# Altium PCB Basic Datalogger-v1.0.PcbDoc (part 1 of 2)
Units mil, origin at the board's own origin, x right, y up, seen from the top; angles counter-clockwise.
Board outline 1637.8 x 1745.25 mil, 2 copper layers (Top Layer, Bottom Layer), stack 57 mil thick; 64 components, 61 nets, 279 pads, 114 vias.
Unrouted connection lines stored in the file: 1.
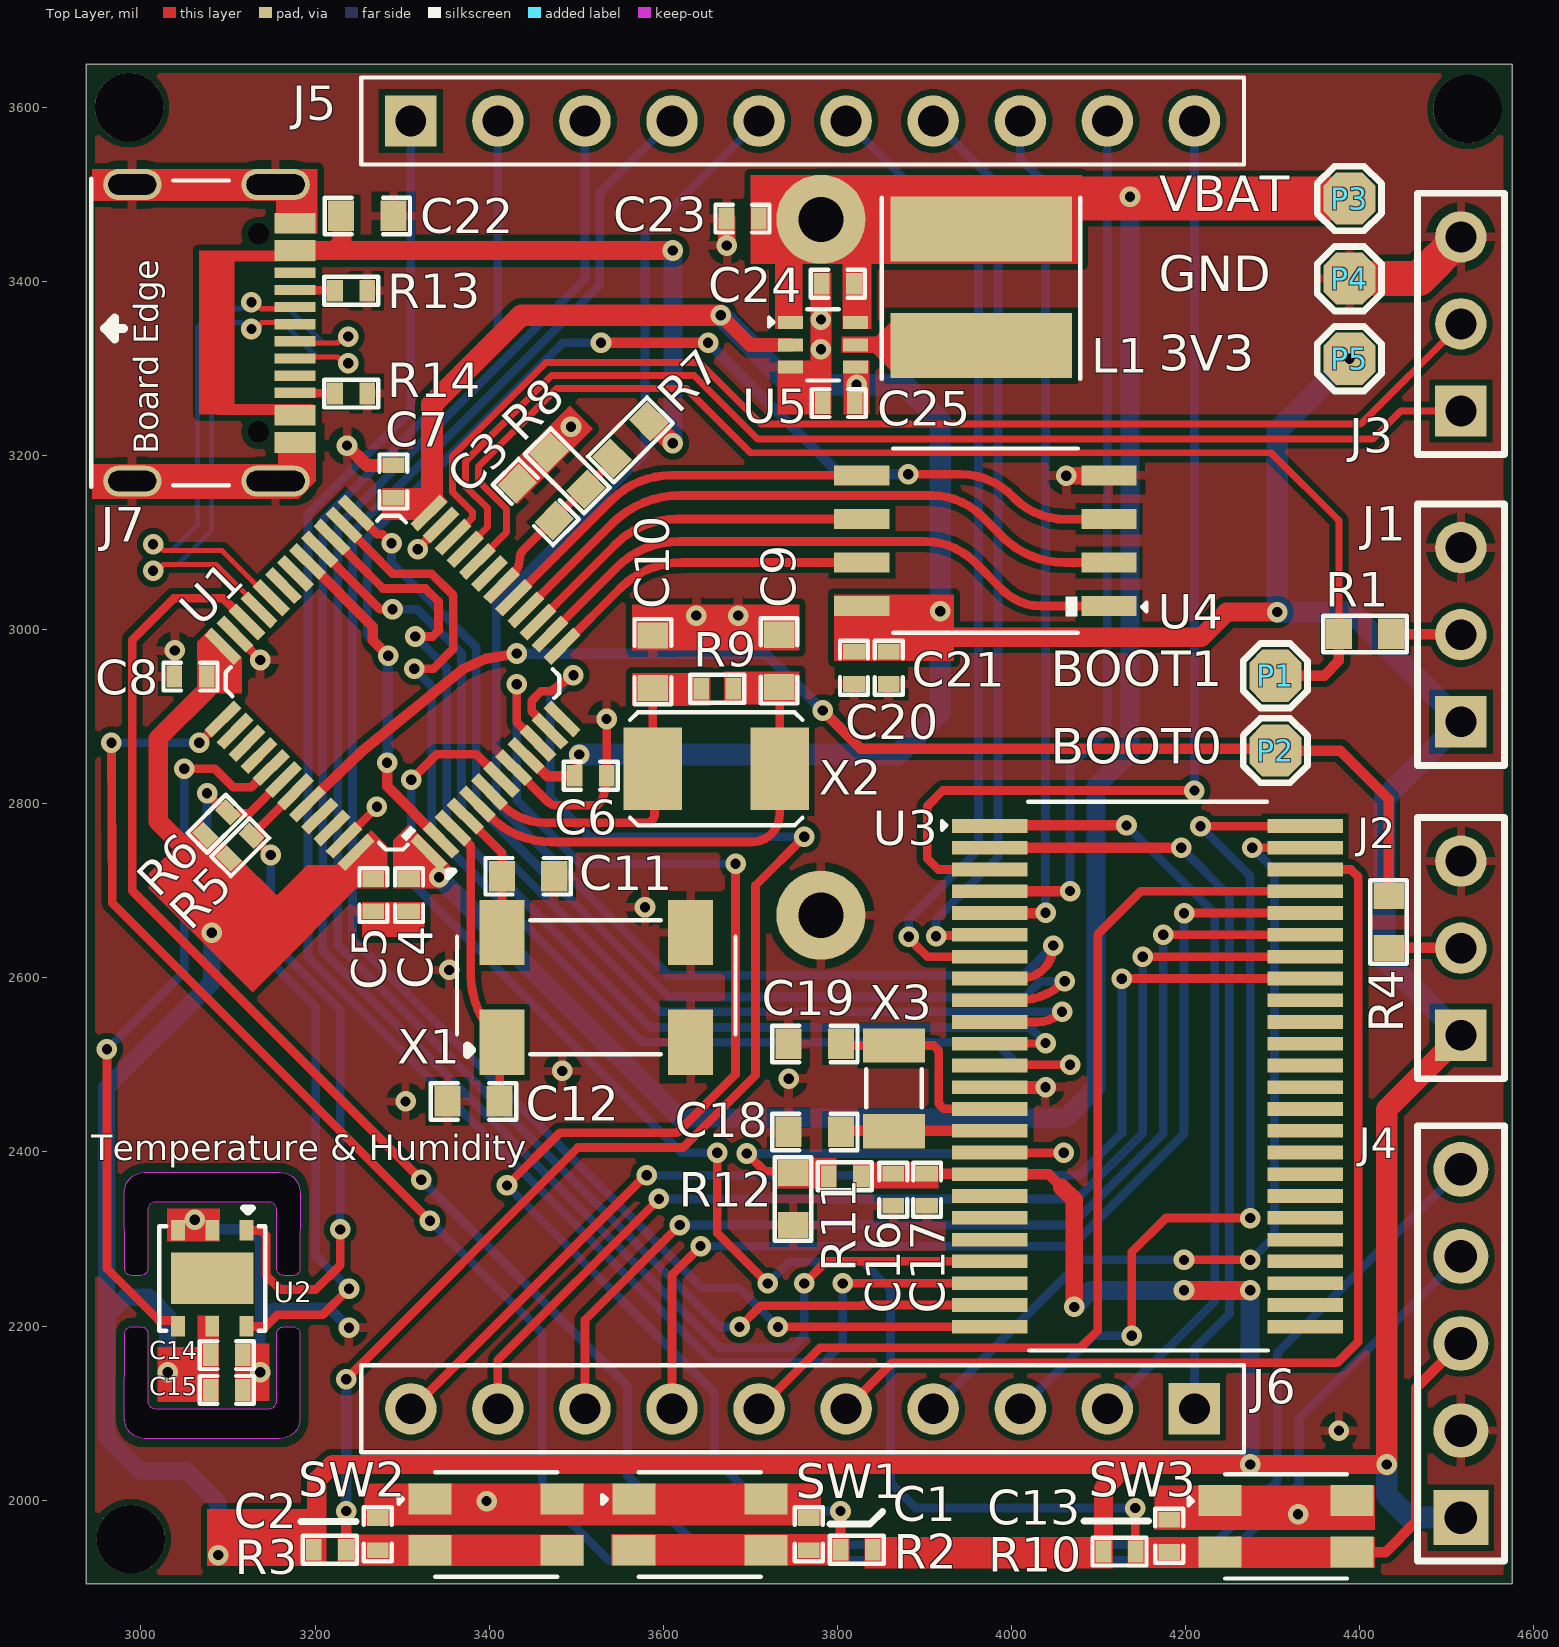
[diagram p0: Top Layer view]
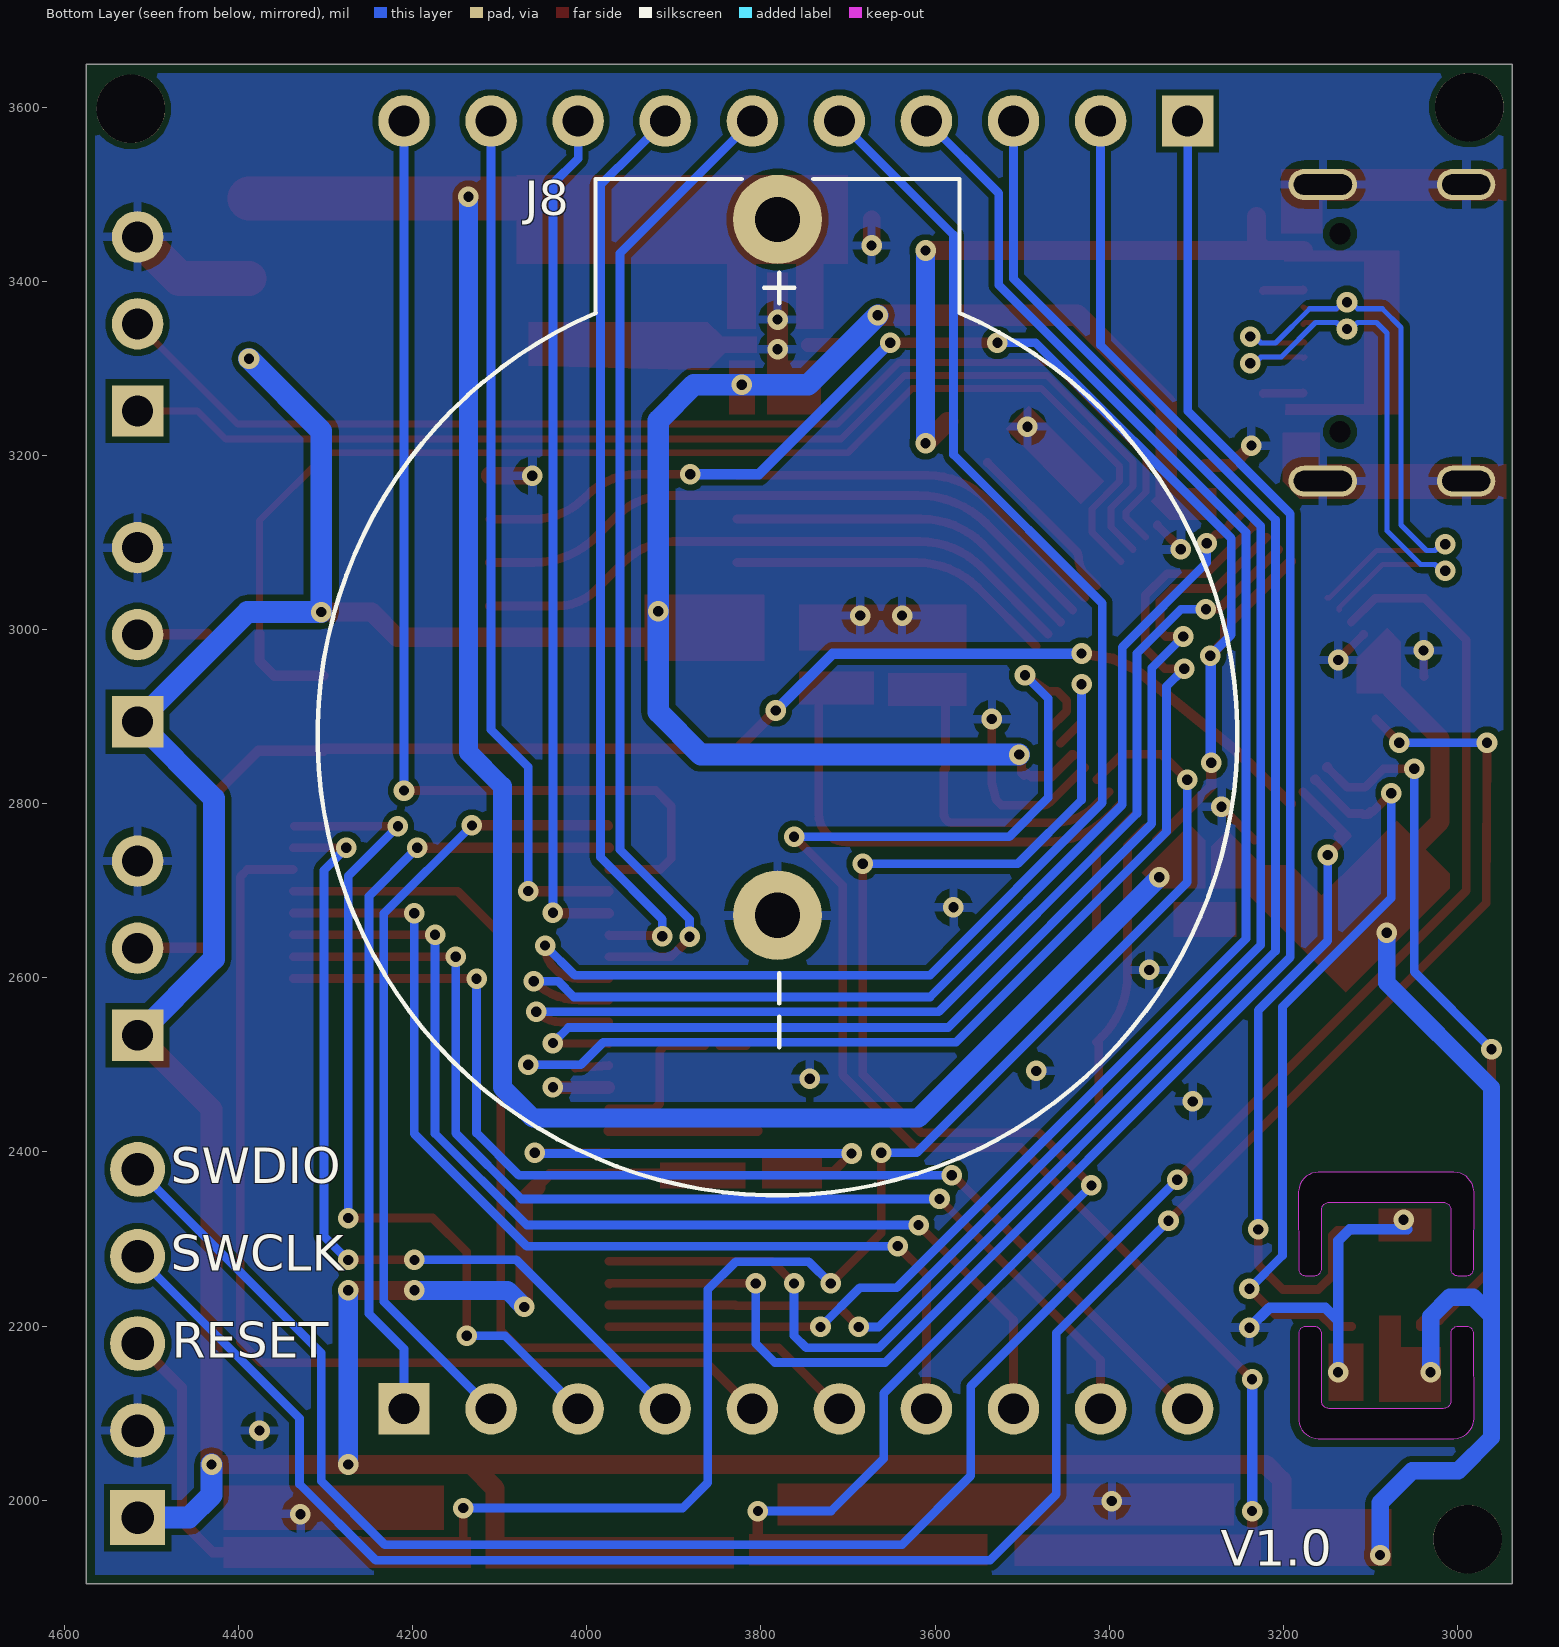
[diagram p1: Bottom Layer view, seen from below]
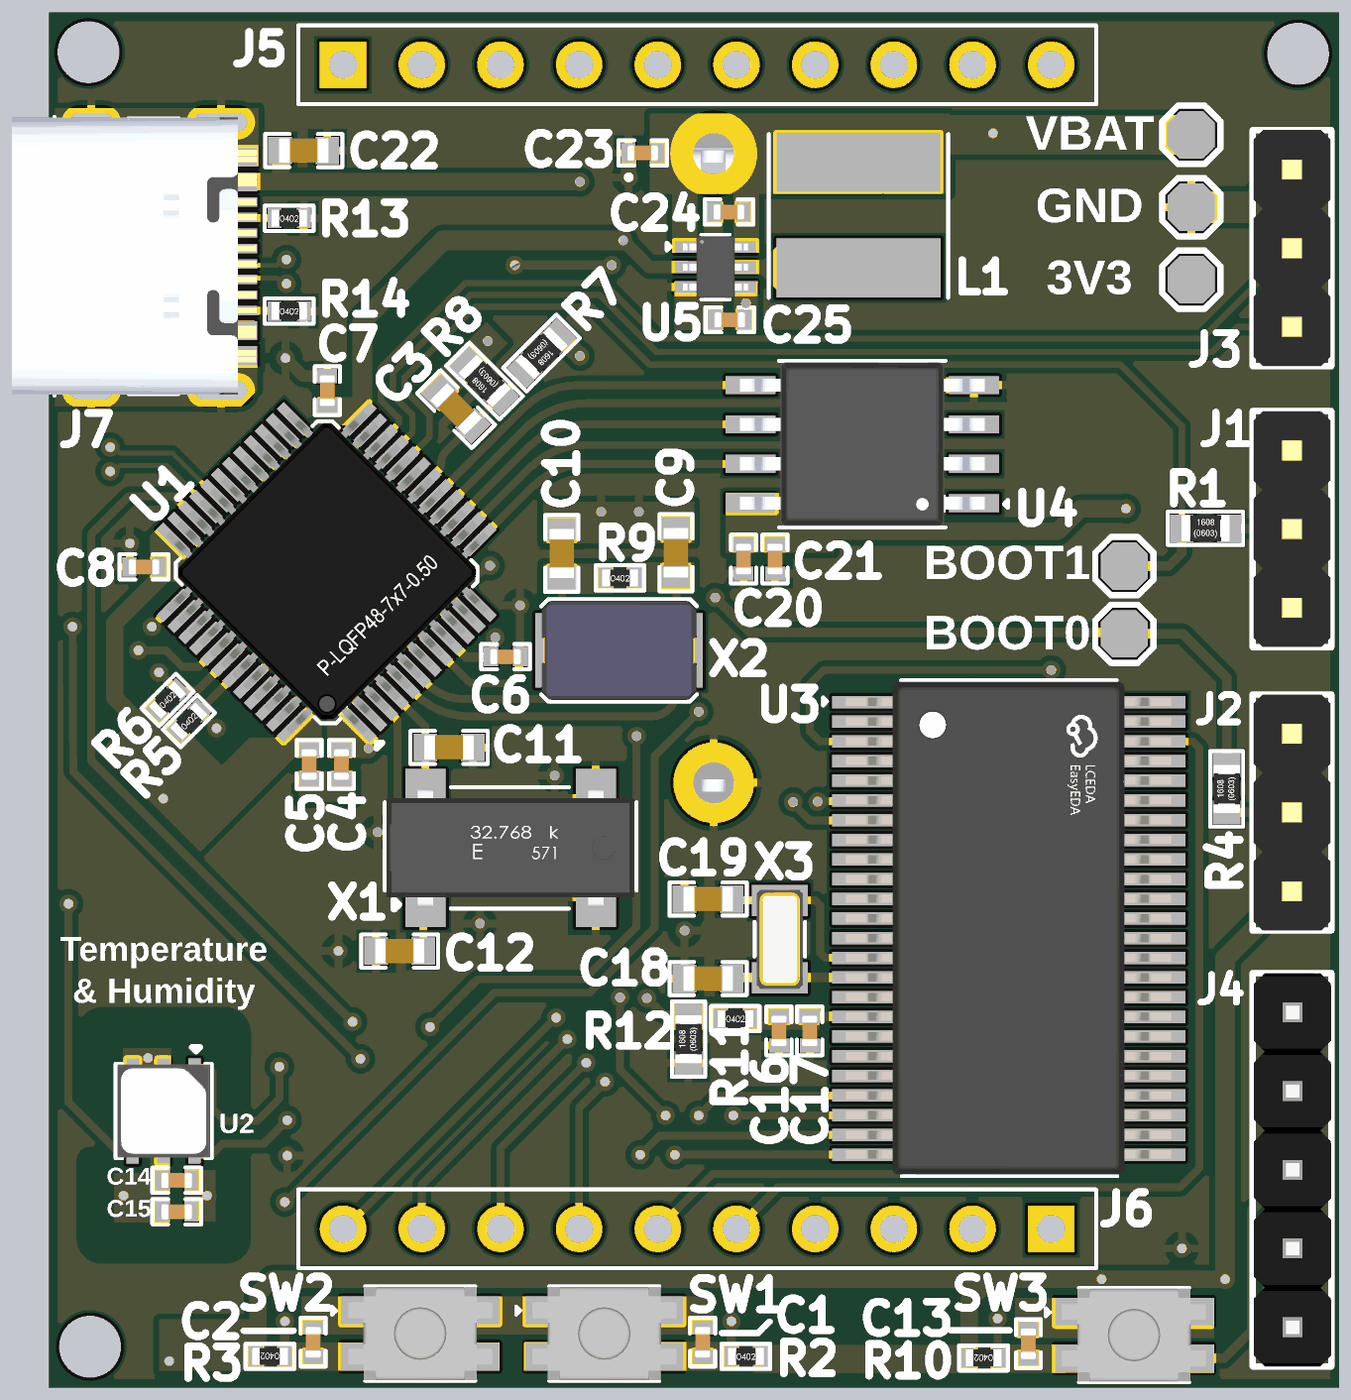
[diagram p2: 3D render of the assembled board from above, using the file's embedded part models]

## Layer stack, top to bottom
Top Solder: solder mask 3, Solder Resist, Dk 3.5
Top Layer: signal copper 10
Dielectric 1: dielectric 37, FR-4, Dk 4.8
Bottom Layer: signal copper 10
Bottom Solder: solder mask 3, Solder Resist, Dk 3.5

## Board outline
2937.2,1904 4575,1904 4575,3649.25 2937.2,3649.25
cut-out: 3182.56,2091.35 cw(c3159.88,2093.63) 3159.88,2070.84 3004.12,2070.84 cw(c3004.12,2093.63) 2981.44,2091.35 2981.02,2092.7 2981.46,2190.58 2981.33,2191.35 cw(c2989.28,2191.35) 2989.28,2199.3 2999.95,2199.31 cw(c2999.95,2191.31) 3007.95,2191.31 3007.95,2113.54 ccw(c3016.25,2113.54) 3016.25,2105.24 3147.75,2105.24 ccw(c3147.75,2113.54) 3156.05,2113.54 3156.05,2191.31 cw(c3164.05,2191.31) 3164.05,2199.31 3174.83,2199.31 cw(c3174.83,2191.62) 3182.5,2192.05 3182.54,2191.63
cut-out: 3182.48,2265.06 cw(c3174.83,2265.75) 3174.83,2258.06 3164.05,2258.06 cw(c3164.05,2266.06) 3156.05,2266.06 3156.05,2333.83 ccw(c3147.75,2333.83) 3147.75,2342.13 3016.25,2342.13 ccw(c3016.25,2333.83) 3007.95,2333.83 3007.95,2266.06 cw(c2999.95,2266.06) 2999.95,2258.06 2989.28,2258.07 cw(c2989.28,2266.02) 2981.33,2266.02 2981.41,2266.65 2981.02,2354.67 2981.44,2356.02 cw(c3004.12,2353.74) 3004.12,2376.53 3159.88,2376.53 cw(c3159.88,2353.74) 3182.56,2356.02 3182.98,2354.67

## Design rules (kind name [scope] priority, off if disabled: settings)
BoardOutlineClearance [All] p1: gap=0 ignorepadtopadclearanceinfootprint=FALSE except(10: Poly-OutlineEdge Poly-CavityEdge Poly-CutoutEdge Poly-SplitBarrior Poly-SplitContinuation)
Clearance [All] p1: gap=7 ignorepadtopadclearanceinfootprint=FALSE except(5: Arc-SMDPad Track-SMDPad SMDPad-SMDPad SMDPad-THPad SMDPad-Hole)
DiffPairsRouting [InDifferentialPair('USB')] p1: maxlimit=10 minlimit=10 mostfreqgap=10 toplayer_minwidth=6 toplayer_maxwidth=6 toplayer_prefwidth=6 bottomlayer_minwidth=6 bottomlayer_maxwidth=6 bottomlayer_prefwidth=6 impedanceprofiledriven=TRUE impedanceprofileid={42EBA23B-1863-4E57-B42D-8314DE1A37D2} impedanceprofilevalue=90.000000 maxuncoupledlength=500
HoleSize [All] p1: absolutevalues=TRUE maxlimit=1000 minlimit=1 maxpercent=80.000 minpercent=20.000
HoleToHoleClearance [All] p1: gap=1 allowstackedmicrovias=TRUE
MatchedLengths "Schematic Matched Net Lengths" [InNetClass('USB')] p1: tolerance=50 checknetsindiffpair=FALSE checkdiffpairvsdiffpair=TRUE checkxsignals=TRUE checkothers=TRUE
MaxMinImpedance "Schematic Impedance Constraint" [InNetClass('USB')] p1: minimum=85.00 maximum=90.00
MinimumSolderMaskSliver [All] p1: minsoldermaskwidth=0
PolygonConnect [All] p1: connectstyle=Relief reliefconductorwidth=10 reliefentries=4 polygonreliefangle="90 Angle" airgapwidth=10
RoutingVias [All] p1: holewidth=11.81 width=23.62 viastyle="Through Hole" minholewidth=11.81 minwidth=23.62 maxholewidth=11.81 maxwidth=23.62
SilkToSilkClearance [All] p1: silktosilkclearance=0
SilkToSolderMaskClearance [IsPad] p1: minsilkscreentomaskgap=0 clearancetoexposedcopper=TRUE
SolderMaskExpansion [All] p1: expansion=4 istentingtop=FALSE
Width [All] p1: maxlimit=100 minlimit=8 preferedwidth=12 minimp=50.000000 maximp=50.000000 favimp=50.000000
24 further rules are at their usual default settings.

## Classes and differential pairs
component class U_Power-Sheet: C22 C23 C24 C25 J7 J8 l L1 R13 R14 U5
differential pair class USB_Lines: USB
net class USB: USB_N USB_P
component class U_TN-Screen-Sheet: C16 C17 C18 C19 J5 J6 R11 R12 U3 X3
component class U_Sensor-Sheet: C14 C15 U2
component class U_EPROM-Sheet: C20 C21 U4
component class U_Controller-Sheet: * C1 C2 C3 C4 C5 C6 C7 C8 C9 C10 C11 C12 C13 J1 J2 J3 J4 P1 P2 P3 P4 P5 R1 R2 R3 R4 R5 R6 R7 R8 R9 R10 SW1 SW2 SW3 U1 X1 X2
differential pair USB: +USB_P -USB_N

## Components (designator, comment, footprint, x,y, rotation, side; value= is the part's Value field where it differs from the comment)
C1 "1uF" Cap-0402 3767,1961 r270 top
C2 "1uF" Cap-0402 3272,1961 r270 top
C3 "0.1uF" Cap-0603 3453.57,3146.43 r315 top locked
C4 "100nF" Cap-0402 3308,2695 r90 top locked
C5 "100nF" Cap-0402 3267,2695 r90 top locked
C6 "100nF" Cap-0402 3516.5,2832 r180 top
C7 "100nF" Cap-0402 3290,3170 r270 top locked
C8 "100nF" Cap-0402 3057,2946 r0 top
C9 "20pF" Cap-0603 3733,2964 r270 top locked
C10 "20pF" Cap-0603 3588,2963 r270 top locked
C11 "20pF" Cap-0603 3444.73,2716.65 r180 top
C12 "20pF" Cap-0603 3382,2458 r0 top
C13 "1uF" Cap-0402 4181,1959 r270 top
C14 "100nF" Cap-0402 3098.6,2166.68 r180 top locked
C15 "1uF" Cap-0402 3098.6,2126.68 r180 top locked
C16 "1uF" Cap-0402 3864,2356.5 r90 top locked
C17 "100nF" Cap-0402 3903,2356.5 r90 top locked
C18 "10pF" Cap-0603 3774,2423 r0 top locked
C19 "10pF" Cap-0603 3774,2524 r0 top locked
C20 "100nF" Cap-0402 3819,2956 r90 top
C21 "1uF" Cap-0402 3859,2956 r90 top
C22 "2.2uF" CAP-0603 3260,3475 r180 top locked
C23 "10uF" Cap-0402 3691,3472 r0 top locked
C24 "10uF" Cap-0402 3800.5,3397 r0 top locked
C25 "10uF" Cap-0402 3801.5,3260 r0 top locked
J1 "61300311121" HDR1X3_ 4516,2894 r90 top locked
J2 "61300311121" HDR1X3_ 4516,2534 r90 top locked
J3 "C49257" HDR1X3_ 4516,3251 r90 top locked
J4 "B-2100S05P-A110" HDR1X5_ 4516,1980 r90 top locked
J5 "DM254R-11-10-85" "HDR 1x10(Female)" 3310,3584 r0 top locked
J6 "DM254R-11-10-85" "HDR 1x10(Female) B" 4210,2105 r180 top locked
J7 "TYPE-C-31-M-12" TYPE-C-31-M-12_ 3177.13,3466.76 r270 top locked
J8 "BS-24-A1AJ008" BS-24-A1AJ008 3781,3071.39 r90 bottom locked
L1 "4.7uH" SCDS4D18T-4R7M-S-N 3965,3392.93 r270 top locked
P1 "TEST POINT" Test-point 4303,2947 r270 top locked
P2 "TEST POINT" Test-point 4303,2861 r270 top locked
P3 "TEST POINT" Test-point 4388,3495 r0 top locked
P4 "TEST POINT" Test-point 4388,3403 r0 top locked
P5 "TEST POINT" Test-point 4388,3311 r0 top locked
R1 "10K" Res-0603 4406,2995 r180 top locked value=10kR
R2 "10K" Res-0402 3822,1943 r0 top
R3 "10K" Res-0402 3217,1943 r180 top
R4 "10K" Res-0603 4433,2664 r270 top locked value=10kR
R5 "4.7K" Res-0402 3114,2750 r45 top locked
R6 "4.7K" Res-0402 3086.92,2776.92 r45 top locked
R7 "5.6K" Res-0603 3562.21,3217.79 r45 top locked
R8 "10K" Res-0603 3489.79,3182.21 r315 top locked value=10kR
R9 "1MR" Res-0402 3662,2932 r0 top locked
R10 "10K" Res-0402 4124,1941 r180 top
R11 "1K" Res-0402 3808.5,2372 r0 top
R12 "10K" Res-0603 3749,2346 r270 top value=10kR
R13 "5.1K" Res-0402 3241.5,3389 r0 top locked
R14 "5.1K" Res-0402 3241.5,3271 r0 top locked
SW1 "TS-1185EC-C-D-B" TS-1185EC-C-D-B_ 3642,1972 r0 top
SW2 "TS-1185EC-C-D-B" TS-1185EC-C-D-B_ 3408,1972 r0 top
SW3 "TS-1185EC-C-D-B" TS-1185EC-C-D-B_ 4315.21,1970 r0 top
U1 "STM32F103CBT6" "48-LQFP (7x7)_" 3288.98,2939 r135 top locked
U2 "HDC2022DEPR" HDC2022DEPR 3082,2254.68 r270 top locked
U3 "HT1621B" SSOP-48-300mil 4156,2480 r0 top locked
U4 "W25Q32JVSSIQ" "SOIC-8 (208 mil)" 3969.93,3102 r180 top locked
U5 "TLV61225DCKR" SC-70-6_ 3783.4,3327 r0 top locked
X1 "32.768kHz" MC-306 3523,2589 r0 top
X2 "8MHz" SMD5032-2P 3660.83,2840 r0 top locked
X3 "32.768kHz" SMD3215-2P 3865,2473 r90 top locked

## Footprints (in the part's own frame and the unit in brackets; to place one, negate y for a bottom-side part, rotate by r counter-clockwise, add the part's x,y. Pads: shape width x height; smd on the part's side, far side on the other; paste and mask are expansions set on the pad)
"48-LQFP (7x7)_" [mm]
  rect 1.22x0.32 smd: 1(-4.25,2.75) 2(-4.25,2.25) 3(-4.25,1.75) 4(-4.25,1.25) 5(-4.25,0.75) 6(-4.25,0.25) 7(-4.25,-0.25) 8(-4.25,-0.75) 9(-4.25,-1.25) 10(-4.25,-1.75) 11(-4.25,-2.25) 12(-4.25,-2.75) 25(4.25,-2.75) 26(4.25,-2.25) 27(4.25,-1.75) 28(4.25,-1.25) 29(4.25,-0.75) 30(4.25,-0.25) 31(4.25,0.25) 32(4.25,0.75) 33(4.25,1.25) 34(4.25,1.75) 35(4.25,2.25) 36(4.25,2.75)
  rect 0.32x1.22 smd: 13(-2.75,-4.25) 14(-2.25,-4.25) 15(-1.75,-4.25) 16(-1.25,-4.25) 17(-0.75,-4.25) 18(-0.25,-4.25) 19(0.25,-4.25) 20(0.75,-4.25) 21(1.25,-4.25) 22(1.75,-4.25) 23(2.25,-4.25) 24(2.75,-4.25) 37(2.75,4.25) 38(2.25,4.25) 39(1.75,4.25) 40(1.25,4.25) 41(0.75,4.25) 42(0.25,4.25) 43(-0.25,4.25) 44(-0.75,4.25) 45(-1.25,4.25) 46(-1.75,4.25) 47(-2.25,4.25) 48(-2.75,4.25)
  silkscreen extent -5.16,-3.58 3.66,3.58, body extent -4.51,-4.51 4.49,4.49, height 1.43
BS-24-A1AJ008 [mm]
  round 2.6 hole 1.32: 1(10.15,0) 2(-10.15,0)
  silkscreen extent -18.32,-13.42 11.33,13.41, body extent -18.28,-13.26 11.33,13.23, height 9.8
Cap-0402 [mil]
  rect 18x25 smd mask+2.36: 1(-18.5,0) 2(18.5,0)
  silkscreen extent -31,-16 31,16, body extent -20,-10 20,10, height 19
Cap-0603 [mil]
  rect 30x35 smd mask+2.36: 1(-30,0) 2(30,0)
  silkscreen extent -49,-21 49,21, body extent -32,-16 31,16, height 34
CAP-0603 [mil]
  rect 30x35 smd mask+2.36: 1(-30,0) 2(30,0)
  silkscreen extent -49,-21 49,21, body extent -32,-16 31,16, height 34
HDC2022DEPR [mm]
  rect 0.6x0.4 smd: 1(-1.4,1) 2(-1.4,0) 3(-1.4,-1) 4(1.4,-1) 5(1.4,0) 6(1.4,1)
  rect 1.5x2.4 smd: 7(0,0)
  silkscreen extent -2.06,-1.55 1.52,1.55, body extent -1.5,-1.5 1.5,1.5, height 1.06
HDR1X3_ [mm] "Connector; Header; 3 Position"
  rect 1.5x1.5 hole 0.9: 1(0,0)
  round 1.5 hole 0.9: 2(2.54,0) 3(5.08,0)
  silkscreen extent -1.27,-1.27 6.35,1.27, body extent -1.27,-1.24 6.35,1.25, height 8.54
HDR1X5_ [mm] "Connector; Header; 5 Position"
  rect 1.6x1.6 hole 0.95: 1(0,0)
  round 1.6 hole 0.95: 2(2.54,0) 3(5.08,0) 4(7.62,0) 5(10.16,0)
  silkscreen extent -1.27,-1.27 11.43,1.27, body extent -1.27,-1.27 11.43,1.23, height 8.65
"HDR 1x10(Female)" [mm]
  rect 1.5x1.5 hole 0.9: 1(0,0)
  round 1.5 hole 0.9: 2(2.54,0) 3(5.08,0) 4(7.62,0) 5(10.16,0) 6(12.7,0) 7(15.24,0) 8(17.78,0) 9(20.32,0) 10(22.86,0)
  silkscreen extent -1.45,-1.27 24.31,1.27
"HDR 1x10(Female) B" [mm]
  rect 1.5x1.5 hole 0.9: 11(0,0)
  round 1.5 hole 0.9: 12(2.54,0) 13(5.08,0) 14(7.62,0) 15(10.16,0) 16(12.7,0) 17(15.24,0) 18(17.78,0) 19(20.32,0) 20(22.86,0)
  silkscreen extent -1.45,-1.27 24.31,1.27
MC-306 [mm]
  rect 1.3x1.9 smd: 1(-2.75,-1.6) 2(2.75,-1.6) 3(2.75,1.6) 4(-2.75,1.6)
  silkscreen extent -4.06,-1.96 4.06,1.96, body extent -4,-1.9 4,1.9, height 2.54
Res-0402 [mil]
  rect 18x25 smd mask+2.17: 1(-18.5,0) 2(18.5,0)
  silkscreen extent -32,-17 32,16, body extent -23,-11 23,11, height 16
Res-0603 [mil]
  rect 30x35 smd: 1(-30,0) 2(30,0)
  silkscreen extent -48,-21 48,21, body extent -31,-17 31,17, height 18
SC-70-6_ [mm]
  rect 0.73x0.38 smd: 1(-0.95,0.65) 2(-0.95,0) 3(-0.95,-0.65) 4(0.95,-0.65) 5(0.95,0) 6(0.95,0.65)
  silkscreen extent -1.57,-1.04 0.46,1.04, body extent -1.05,-1 1.05,1, height 0.92
SCDS4D18T-4R7M-S-N [mm]
  rect 1.9x5.3 smd: 1(-1.7,0) 2(1.7,0)
  silkscreen extent -2.62,-2.9 2.67,2.9
SMD3215-2P [mm]
  rect 1x1.8 smd: 1(-1.25,0) 2(1.25,0)
  silkscreen extent -0.56,-0.81 0.56,0.81, body extent -1.6,-0.75 1.6,0.75, height 0.8
SMD5032-2P [mm]
  rect 1.7x2.4 smd: 1(-1.85,0) 2(1.85,0)
  silkscreen extent -2.51,-1.65 2.51,1.65, body extent -2.5,-1.6 2.5,1.6, height 1.3
"SOIC-8 (208 mil)" [mm]
  rect 1.61x0.58 smd: 1(-3.605,1.905) 2(-3.605,0.635) 3(-3.605,-0.635) 4(-3.605,-1.905) 5(3.605,-1.905) 6(3.605,-0.635) 7(3.605,0.635) 8(3.605,1.905)
  silkscreen extent -4.7,-2.69 2.69,2.69, body extent -3.95,-2.64 3.95,2.64, height 2.16
SSOP-48-300mil [mm]
  rect 2.2x0.4 smd: 1(-4.6,7.475) 2(-4.6,6.84) 3(-4.6,6.205) 4(-4.6,5.57) 5(-4.6,4.935) 6(-4.6,4.3) 7(-4.6,3.665) 8(-4.6,3.03) 9(-4.6,2.395) 10(-4.6,1.76) 11(-4.6,1.125) 12(-4.6,0.49) 13(-4.6,-0.145) 14(-4.6,-0.78) 15(-4.6,-1.415) 16(-4.6,-2.05) 17(-4.6,-2.685) 18(-4.6,-3.32) 19(-4.6,-3.955) 20(-4.6,-4.59) 21(-4.6,-5.225) 22(-4.6,-5.86) 23(-4.6,-6.495) 24(-4.6,-7.13) 25(4.6,-7.13) 26(4.6,-6.495) 27(4.6,-5.86) 28(4.6,-5.225) 29(4.6,-4.59) 30(4.6,-3.955) 31(4.6,-3.32) 32(4.6,-2.685) 33(4.6,-2.05) 34(4.6,-1.415) 35(4.6,-0.78) 36(4.6,-0.145) 37(4.6,0.49) 38(4.6,1.125) 39(4.6,1.76) 40(4.6,2.395) 41(4.6,3.03) 42(4.6,3.665) 43(4.6,4.3) 44(4.6,4.935) 45(4.6,5.57) 46(4.6,6.205) 47(4.6,6.84) 48(4.6,7.475)
  silkscreen extent -5.99,-7.82 3.51,8.18, body extent -5.26,-7.77 5.24,8.13, height 2.79
Test-point [mil]
  oct 60x60 smd: 1(0,0)
  silkscreen extent -37,-37 37,37
TS-1185EC-C-D-B_ [mm]
  rect 1.25x0.9 smd: 1(-1.925,0.75) 1(1.925,0.75) 2(-1.925,-0.75) 2(1.925,-0.75)
  silkscreen extent -2.84,-1.52 1.78,1.52, body extent -2.33,-1.5 2.32,1.5, height 2
TYPE-C-31-M-12_ [mm]
  rect 0.6x1.2 smd: A1/B12(0,0) A4/B9(0.8,0) B1/A12(6.4,0) B4/A9(5.6,0)
  rect 0.3x1.2 smd: A5(1.95,0) A6(2.95,0) A7(3.45,0) A8(4.45,0) B5(4.95,0) B6(3.95,0) B7(2.45,0) B8(1.45,0)
  round 0 hole 0.62 unplated: MH(0.31,-1.07) MH(6.09,-1.07)
  oval 0.9x2 hole 0.6 slot 1.7 at 90 deg: S1(7.525,-0.57) S4(-1.125,-0.57)
  oval 0.9x1.7 hole 0.6 slot 1.4 at 90 deg: S2(7.525,-4.75) S3(-1.125,-4.75)
  silkscreen extent -1.3,-5.94 7.7,-1.93, body extent -1.27,-7.32 7.67,0.58, height 3.31

## Part data
C1 C2 C13 C15 C16 C21: library part UMK105CBJ105MV-F, "CAP CER 1UF 50V X5R 0402", LCSC Part Number=C2880413, Manufacturer="Taiyo Yuden", Supplier Part Number 1=587-6278-1-ND, ComponentLink1Description=http://www.farnell.com/datasheets/2801300.pdf?src-supplier=Newark, ComponentLink1URL=http://www.farnell.com/datasheets/2801300.pdf?src-supplier=Newark, ComponentLink2Description=http://www.farnell.com/datasheets/2801300.pdf?src-supplier=Farnell, ComponentLink2URL=http://www.farnell.com/datasheets/2801300.pdf?src-supplier=Farnell, ComponentLink3Description="https://ds.yuden.co.jp/TYCOMPAS/ut/detail?pn=UMK105CBJ105MV-F &amp;u=M&src-supplier=Digi-Key", ComponentLink3URL="https://ds.yuden.co.jp/TYCOMPAS/ut/detail?pn=UMK105CBJ105MV-F &amp;u=M&src-supplier=Digi-Key", Item Type=Capacitor, Lead Free="Lead Free", Manufacturer Part Number=UMK105CBJ105MV-F, Pricing 1="1=0.27, 10=0.184, 50=0.1224, 100=0.104, 500=0.07342, 1000=0.06424, 2500=0.06118, 5000=0.05659 (USD)", RoHS Compliant=Yes, Stock 1=412061, Supplier 1=Digi-Key
C3: library part CL10B104KB8NNNC, "CAP CER 0.1UF 50V X7R 0603", Capacitance=100nF, Case Code (Imperial)=0603, Case Code (Metric)=1608, Dielectric=X7R, LCSC Part Number=C1591, Manufacturer=Samsung, Max Operating Temperature=125°C, Min Operating Temperature=-55°C, Package Quantity=1, Supplier Part Number 1=1276-1000-1-ND, Tolerance=10%, Voltage=50V, Case/Package=0603, Category="Ceramic Capacitors", ComponentLink1Description=https://datasheet.ciiva.com/25803/cl10b104kb8nnnc-25803393.pdf?src-supplier=Digi-Key, ComponentLink1URL=https://datasheet.ciiva.com/25803/cl10b104kb8nnnc-25803393.pdf?src-supplier=Digi-Key, ComponentLink2Description=https://datasheet.ciiva.com/26838/getdatasheetpartid-89097-26838411.pdf?src-supplier=Verical, ComponentLink2URL=https://datasheet.ciiva.com/26838/getdatasheetpartid-89097-26838411.pdf?src-supplier=Verical, ComponentLink3Description=https://datasheet.ciiva.com/29198/456651-da-01-en-vs-kondensator-0605-29198839.pdf?src-supplier=Conrad, ComponentLink3URL=https://datasheet.ciiva.com/29198/456651-da-01-en-vs-kondensator-0605-29198839.pdf?src-supplier=Conrad, Construction=Flat, Contact Plating=Tin, Depth=0.8mm, Height=0.8mm, Lead Free="Lead Free", Length=1.6mm, Manufacturer Part Number=CL10B104KB8NNNC, Material=Ceramic, Mount="Surface Mount", Packaging="Tape and Reel", Pricing 1="1=0.10000, 10=0.03000, 50=0.01640, 100=0.01340, 500=0.00954, 1000=0.00750 (USD)", Radiation Hardening=No, RoHS=Yes, RoHS Compliant=Yes, Series=CL, Stock 1=3998791, Supplier 1=Digi-Key, Thickness=0.035inch, Voltage Rating=50V, Voltage Rating (DC)=50V, Width=0.031inch
C4 C5 C6 C7 C8 C14 C17 C20: library part CC0402KRX5R7BB104, "CAP CER 0.1UF 16V X5R 0402", Case Code (Imperial)=0402, Case Code (Metric)=1005, Dielectric=X5R, LCSC Part Number=C106204, Manufacturer=Yageo, Max Operating Temperature=85°C, Min Operating Temperature=-55°C, Package Quantity=1, Resistor Type=Ceramic, Supplier Part Number 1=603-CC402KRX5R7BB104, Tolerance=10%, Voltage Rating=16V, Capacitance=100nF, Case/Package=0402, Category="Ceramic Capacitors", ComponentLink1Description=https://datasheet.ciiva.com/155/mlccorderingcode-155879.pdf?src-supplier=Digi-Key, ComponentLink1URL=https://datasheet.ciiva.com/155/mlccorderingcode-155879.pdf?src-supplier=Digi-Key, ComponentLink2Description=https://datasheet.ciiva.com/155/mlccorderingcode-155878.pdf?src-supplier=Digi-Key, ComponentLink2URL=https://datasheet.ciiva.com/155/mlccorderingcode-155878.pdf?src-supplier=Digi-Key, ComponentLink3Description=https://datasheet.ciiva.com/155/mlccorderingcode-155880.pdf?src-supplier=Digi-Key, ComponentLink3URL=https://datasheet.ciiva.com/155/mlccorderingcode-155880.pdf?src-supplier=Digi-Key, ComponentLink4Description=https://datasheet.ciiva.com/11464/upy-gphc-x5r-4v-to-50v-12-11464869.pdf?src-supplier=Avnet, ComponentLink4URL=https://datasheet.ciiva.com/11464/upy-gphc-x5r-4v-to-50v-12-11464869.pdf?src-supplier=Avnet, Construction=Flat, Depth=0.5mm, Halogen Free="Halogen Free", Height=0.5mm, Lead Free="Lead Free", Length=1mm, Manufacturer Part Number=CC0402KRX5R7BB104, Mount="Surface Mount", Number of Pins=2, Packaging="Tape and Reel", Pricing 1="1=0.10000, 10=0.02300, 50=0.02300, 100=0.01100, 1000=0.00600, 10000=0.00400 (USD)", Radiation Hardening=No, REACH SVHC=Unknown, RoHS=Yes, RoHS Compliant=Yes, Series=CC, Stock 1=936792, Supplier 1=Mouser, Termination=SMD/SMT, Thickness=0.022inch, Voltage Rating (DC)=16V, Width=0.02inch
C9 C10 C11 C12: library part CC0603JRNPO9BN200, "CAP CER 20PF 50V C0G/NPO 0603", Case Code (Imperial)=0603, Case Code (Metric)=1608, Dielectric=C0G, LCSC Part Number=C105621, Manufacturer=Yageo, Max Operating Temperature=125°C, Min Operating Temperature=-55°C, Package Quantity=4000, Supplier Part Number 1=311-1424-6-ND, Tolerance=5%, Voltage Rating=50V, Capacitance=20pF, Case/Package=0603, ComponentLink1Description=http://www.farnell.com/datasheets/1132289.pdf?src-supplier=Element14, ComponentLink1URL=http://www.farnell.com/datasheets/1132289.pdf?src-supplier=Element14, ComponentLink2Description=http://www.yageo.com/documents/recent/UPY-GP_NP0_16V-to-50V_16.pdf?src-supplier=Digi-Key, ComponentLink2URL=http://www.yageo.com/documents/recent/UPY-GP_NP0_16V-to-50V_16.pdf?src-supplier=Digi-Key, Composition=Ceramic, Depth=0.8mm, Item Type=Capacitor, Lead Free="Lead Free", Length=1.6mm, Manufacturer Part Number=CC0603JRNPO9BN200, Mount="Surface Mount", Number of Pins=2, Packaging="Tape and Reel", Pricing 1="1=0.1, 10=0.048, 100=0.0214, 500=0.01526, 1000=0.01198 (USD)", REACH SVHC=Unknown, Stock 1=259568, Supplier 1=Digi-Key, Termination=SMD/SMT, Thickness=0.035inch, Voltage Rating (DC)=50V, Weight=7.1E-05oz, Width=0.8mm
C18 C19: library part CC0603JRNPO9BN100, "CAP CER 10PF 50V C0G/NPO 0603", Case Code (Imperial)=0603, Case Code (Metric)=1608, Dielectric=C0G, Insulation Resistance=100GR, LCSC Part Number=C106245, Manufacturer=Yageo, Max Operating Temperature=125°C, Min Operating Temperature=-55°C, Package Quantity=1, Resistor Type=Ceramic, Supplier Part Number 1=311-1058-1-ND, Temperature Coefficient=30ppm/°C, Tolerance=5%, Voltage=50V, Capacitance=10pF, Case/Package=0603, Category="Ceramic Capacitors", ComponentLink1Description=https://datasheet.ciiva.com/25787/cl10a475ka8nqnc-25787017.pdf?src-supplier=Digi-Key, ComponentLink1URL=https://datasheet.ciiva.com/25787/cl10a475ka8nqnc-25787017.pdf?src-supplier=Digi-Key, ComponentLink2Description=https://datasheet.ciiva.com/144/mlccorderingcode-144651.pdf?src-supplier=Digi-Key, ComponentLink2URL=https://datasheet.ciiva.com/144/mlccorderingcode-144651.pdf?src-supplier=Digi-Key, ComponentLink3Description=https://datasheet.ciiva.com/11786/0900766b8079c870-11786407.pdf?src-supplier=RSComponents, ComponentLink3URL=https://datasheet.ciiva.com/11786/0900766b8079c870-11786407.pdf?src-supplier=RSComponents, ComponentLink4Description=https://datasheet.ciiva.com/5789/1734582-5789616.pdf?src-supplier=Farnell, ComponentLink4URL=https://datasheet.ciiva.com/5789/1734582-5789616.pdf?src-supplier=Farnell, ComponentLink5Description=https://datasheet.ciiva.com/26862/getdatasheetpartid-403524-26862758.pdf?src-supplier=Verical, ComponentLink5URL=https://datasheet.ciiva.com/26862/getdatasheetpartid-403524-26862758.pdf?src-supplier=Verical, ComponentLink6Description=https://datasheet.ciiva.com/7978/1132289-7978126.pdf?src-supplier=Element14, ComponentLink6URL=https://datasheet.ciiva.com/7978/1132289-7978126.pdf?src-supplier=Element14, ComponentLink7Description=https://datasheet.ciiva.com/46430/1835847-46430150.pdf?src-supplier=Element14, ComponentLink7URL=https://datasheet.ciiva.com/46430/1835847-46430150.pdf?src-supplier=Element14, ComponentLink8Description=https://datasheet.ciiva.com/144/mlccorderingcode-144650.pdf?src-supplier=Digi-Key, ComponentLink8URL=https://datasheet.ciiva.com/144/mlccorderingcode-144650.pdf?src-supplier=Digi-Key, ComponentLink9Description=https://datasheet.ciiva.com/144/mlccorderingcode-144649.pdf?src-supplier=Digi-Key, ComponentLink9URL=https://datasheet.ciiva.com/144/mlccorderingcode-144649.pdf?src-supplier=Digi-Key, ComponentLink10Description=https://datasheet.ciiva.com/5425/upy-gp-np0-16v-to-50v-8-5425564.pdf?src-supplier=Mouser, ComponentLink10URL=https://datasheet.ciiva.com/5425/upy-gp-np0-16v-to-50v-8-5425564.pdf?src-supplier=Mouser, ComponentLink11Description=https://datasheet.ciiva.com/8033/1734582-8033710.pdf?src-supplier=Element14, ComponentLink11URL=https://datasheet.ciiva.com/8033/1734582-8033710.pdf?src-supplier=Element14, ComponentLink12Description=https://datasheet.ciiva.com/8033/1734582-8033706.pdf?src-supplier=Element14, ComponentLink12URL=https://datasheet.ciiva.com/8033/1734582-8033706.pdf?src-supplier=Element14, Depth=0.8mm, Height=0.8mm, Lead Free="Lead Free", Length=1.6mm, Manufacturer Part Number=CC0603JRNPO9BN100, Mount="Surface Mount", Number of Pins=2, Packaging="Tape and Reel", Pricing 1="1=0.10000, 10=0.03900, 50=0.02120, 100=0.01740, 500=0.01240, 1000=0.00974 (USD)", Radiation Hardening=No, REACH SVHC="No SVHC", RoHS=Yes, RoHS Compliant=Yes, Series=CC, Stock 1=1700978, Supplier 1=Digi-Key, Termination=SMD/SMT, Thickness=0.035inch, Voltage Rating=50V, Voltage Rating (DC)=50V, Width=0.031inch
C22: library part CC0603KRX5R8BB225, "CAP CER 2.2UF 25V X5R 0603", Case Code (Imperial)=0603, Case Code (Metric)=1608, Dielectric=X5R, LCSC Part Number=C309478, Manufacturer=Yageo, Max Operating Temperature=85°C, Min Operating Temperature=-55°C, Package Quantity=4000, Resistor Type=Ceramic, Supplier Part Number 1=311-1786-1-ND, Tolerance=10%, Voltage Rating=25V, Capacitance=2.2uF, Case/Package=0603, ComponentLink1Description=https://www.verical.com/server-webapp/html/getDatasheet?partID=782757&src-supplier=Verical, ComponentLink1URL=https://www.verical.com/server-webapp/html/getDatasheet?partID=782757&src-supplier=Verical, Depth=0.8mm, Halogen Free="Halogen Free", Item Type=Capacitor, Lead Free="Lead Free", Length=1.6mm, Manufacturer Part Number=CC0603KRX5R8BB225, Mount="Surface Mount", Packaging="Tape and Reel", Pricing 1="1=0.4, 10=0.276, 50=0.1932, 100=0.1656, 500=0.1242, 1000=0.10488 (USD)", Radiation Hardening=No, RoHS Compliant=Yes, Stock 1=687936, Supplier 1=Digi-Key, Termination=SMD/SMT, Thickness=0.037inch, Voltage Rating (DC)=25V, Weight=7.1E-05oz, Width=0.031inch
C23 C24 C25: library part CL05A106MP5NUNC, "CAP CER 10UF 10V X5R 0402", Case Code (Imperial)=0402, Case Code (Metric)=1005, Dielectric=X5R, LCSC Part Number=C315248, Manufacturer=Samsung, Max Operating Temperature=85°C, Min Operating Temperature=-55°C, Package Quantity=1, Tolerance=20%, Voltage Rating=10V, Capacitance=10uF, Case/Package=0402, Category="Ceramic Capacitors", ComponentLink1Description=https://datasheet.ciiva.com/25721/cl05a106mp5nunc-25721584.pdf?src-supplier=Digi-Key, ComponentLink1URL=https://datasheet.ciiva.com/25721/cl05a106mp5nunc-25721584.pdf?src-supplier=Digi-Key, ComponentLink2Description=https://datasheet.ciiva.com/26838/getdatasheetpartid-745310-26838170.pdf?src-supplier=Verical, ComponentLink2URL=https://datasheet.ciiva.com/26838/getdatasheetpartid-745310-26838170.pdf?src-supplier=Verical, Construction=Flat, Contact Plating=Tin, Depth=0.5mm, Item Type=Capacitor, Lead Free="Lead Free", Length=1mm, Manufacturer Part Number=CL05A106MP5NUNC, Mount="Surface Mount", Packaging="Tape and Reel", Pricing 1="10000=0.02537 (USD)", Radiation Hardening=No, RoHS=Yes, RoHS Compliant=Yes, Series=CL, Stock 1=1729850, Supplier 1=Avnet, Supplier Part Number 1=CL05A106MP5NUNC, Termination=Wraparound, Thickness=0.028inch, Width=0.02inch
J1 J2: "CONN HEADER VERT 3POS 2.54MM", Color=Black, Manufacturer="Wurth Electronics", Supplier Part Number 1=732-5316-ND, ComponentLink1Description=http://www.farnell.com/cad/1737268.pdf?src-supplier=Element14, ComponentLink1URL=http://www.farnell.com/cad/1737268.pdf?src-supplier=Element14, ComponentLink2Description=https://katalog.we-online.de/em/datasheet/6130xx11121.pdf?src-supplier=Digi-Key, ComponentLink2URL=https://katalog.we-online.de/em/datasheet/6130xx11121.pdf?src-supplier=Digi-Key, Connector Type="Male Pin", Contact Material=Copper, Contact Mating Length=0.236inch, Contact Plating=Gold, Gender=Male, Item Type="Male Header", Lead Free="Lead Free", Manufacturer Part Number=61300311121, Mount="Through Hole", Number of Contacts=3, Number of Positions=3, Number of Rows=1, Packaging=Bulk, Pitch=0.1inch, Pricing 1="1=0.13, 10=0.106, 25=0.088, 50=0.074, 100=0.067, 1000=0.061 (USD)", REACH SVHC=Unknown, Stock 1=81286, Supplier 1=Digi-Key, Termination=Solder
J3: "3A Straight Square Pins -40℃~+105℃ 3 2.54mm Black 1x3P Plugin,P=2.54mm Pin Headers ROHS", Manufacturer=BOOMELE, ComponentLink1Description=LCSC, ComponentLink1URL=https://www.lcsc.com/product-detail/Pin-Headers_BOOMELE-Boom-Precision-Elec-C49257_C49257.html, Item Type=Header, LCSC Part Number=C49257, Manufacturer Part Number=C49257
J4: "Straight 2.54mm 6mm -40℃~+105℃ 3mm 5 2.54mm Plugin Black Brass 1x5P Plugin,P=2.54mm Pin Headers ROHS", LCSC Part Number=C124379, Manufacturer="Ckmtw(Shenzhen Cankemeng)", Package=Plugin,P=2.54mm, ComponentLink1Description=LCSC, ComponentLink1URL=https://www.lcsc.com/product-detail/Pin-Headers_Ckmtw-Shenzhen-Cankemeng-B-2100S05P-A110_C124379.html, Item Type=Header, Manufacturer Part Number=B-2100S05P-A110
J5: library part "TH LCD Header (A)", "2.54mm Plugin 3A 10P Straight 1x10P 8.5mm Top Square Holes Plugin,P=2.54mm Female Headers ROHS", LCSC Part Number=C2935981, Manufacturer=DEALON, Package=Plugin,P=2.54mm, ComponentLink1Description=LCSC, ComponentLink1URL=https://www.lcsc.com/product-detail/span-style-background-color-ff0-Female-span-Headers_DEALON-DM254R-11-10-85_C2935981.html, Item Type="Female Header", Manufacturer Part Number=DM254R-11-10-85
J6: library part "TH LCD Header (B)", "2.54mm Plugin 3A 10P Straight 1x10P 8.5mm Top Square Holes Plugin,P=2.54mm Female Headers ROHS", LCSC Part Number=C2935981, Manufacturer=DEALON, Package=Plugin,P=2.54mm, ComponentLink1Description=LCSC, ComponentLink1URL=https://www.lcsc.com/product-detail/span-style-background-color-ff0-Female-span-Headers_DEALON-DM254R-11-10-85_C2935981.html, Item Type="Female Header", Manufacturer Part Number=DM254R-11-10-85
J7: "250mA 1 16 Female Type-C SMD USB Connectors ROHS", LCSC Part Number=C165948, Manufacturer="Korean Hroparts Elec", ComponentLink1Description=LCSC, ComponentLink1URL=https://www.lcsc.com/product-detail/USB-Connectors_Korean-Hroparts-Elec-TYPE-C-31-M-12_C165948.html, Item Type="USB Connector", Manufacturer Part Number=TYPE-C-31-M-12
J8: "Battery base -25℃~+85℃ CR2477 Plugin Battery Connectors ROHS", LCSC Part Number=C964814, Manufacturer=MYOUNG, Package=Plugin, ComponentLink1Description=LCSC, ComponentLink1URL=https://www.lcsc.com/product-detail/Pre-ordered-Products_MYOUNG-BS-24-A1AJ008_C964814.html, Item Type="Battery Connector", Manufacturer Part Number=BS-24-A1AJ008
L1: library part SCDS4D18T-4R7M-S-N, "840mA 4.7uH ±20% SMD Power Inductors ROHS", LCSC Part Number=C329652, Manufacturer="Chilisin Elec", Package=SMD, ComponentLink1Description=LCSC, ComponentLink1URL=https://www.lcsc.com/product-detail/Power-Inductors_Chilisin-Elec-SCDS4D18T-4R7M-S-N_C329652.html, Item Type=Inductor, Manufacturer Part Number=SCDS4D18T-4R7M-S-N
P1 P2 P3 P4 P5: "Test Point ON", Item Type="TEST POINT"
R1 R4 R8 R12: library part RT0603BRD0710KL, "RES SMD 10K OHM 0.1% 1/10W 0603", Case/Package=0603, LCSC Part Number=C95204, Manufacturer=Yageo, Max Operating Temperature=155°C, Min Operating Temperature=-55°C, Package Height=0.45mm, Package Length=1.6mm, Package Style=SMTMeter, Package Width=0.8mm, Power=100mW, Rated Temperature=70°C, Resistor Type="FIXED RESISTOR", Supplier Part Number 1=1991391P, Temperature Coefficient=25ppm/°C, Tolerance=0.1%, Working Voltage=75V, Category="Chip SMD Resistors", ComponentLink1Description=https://datasheet.ciiva.com:443/pdfs/VipMasterIC/IC/YAGO/YAGO-S-A0008510989/YAGO-S-A0008510989-1.pdf?src-supplier=IHS+Markit, ComponentLink1URL=https://datasheet.ciiva.com:443/pdfs/VipMasterIC/IC/YAGO/YAGO-S-A0008510989/YAGO-S-A0008510989-1.pdf?src-supplier=IHS+Markit, ComponentLink2Description=https://datasheet.ciiva.com/5624/pyu-rt-1-to-0-05-rohs-l-4-5624351.pdf?src-supplier=Mouser, ComponentLink2URL=https://datasheet.ciiva.com/5624/pyu-rt-1-to-0-05-rohs-l-4-5624351.pdf?src-supplier=Mouser, ComponentLink3Description=https://datasheet.ciiva.com/29721/pyu-rt-1-to-0-05-rohs-l-4-29721177.pdf?src-supplier=Digi-Key, ComponentLink3URL=https://datasheet.ciiva.com/29721/pyu-rt-1-to-0-05-rohs-l-4-29721177.pdf?src-supplier=Digi-Key, Construction=Chip, Item Type=Resistor, Manufacturer Part Number=RT0603BRD0710KL, Mounting Technology="Surface Mount", Packaging="Tape and Reel", Pins=2, Pricing 1="100=0.29800, 250=0.27800, 500=0.25900, 1000=0.23700 (GBP)", Reach SVHC Compliant=Yes, RoHS=Yes, RoHS Compliant=Yes, Stock 1=20510, Supplier 1=Rs, Technology="THIN FILM", Termination=Wraparound
R2 R3 R10: library part SR0402FR-7T10KL, "RES 10K OHM 1% 1/5W 0402", LCSC Part Number=C854480, Manufacturer=Yageo, Supplier Part Number 1=YAG5815CT-ND, ComponentLink1Description=http://www.yageo.com/documents/recent/PYu-SR_D_F%20tol_RoHS_L_3.pdf?src-supplier=Digi-Key, ComponentLink1URL=http://www.yageo.com/documents/recent/PYu-SR_D_F%20tol_RoHS_L_3.pdf?src-supplier=Digi-Key, Manufacturer Part Number=SR0402FR-7T10KL, Pricing 1="1=0.56, 10=0.398, 100=0.2072, 1000=0.11156, 2500=0.10757, 5000=0.10598 (USD)", RoHS Compliant=Yes, Stock 1=7859, Supplier 1=Digi-Key
R5 R6: library part RMCF0402FT4K70, "RES 4.7K OHM 1% 1/16W 0402", Case Code (Imperial)=0402, Case Code (Metric)=1005, LCSC Part Number=C2479370, Manufacturer="Stackpole Electronics", Max Operating Temperature=155°C, Max Power Dissipation=63mW, Min Operating Temperature=-55°C, Resistance=4.7kR, Resistor Type="Thick Film", Supplier Part Number 1=RMCF0402FT4K70CT-ND, Temperature Coefficient=100ppm/°C, Tolerance=1%, Case/Package=0402, ComponentLink1Description=https://www.verical.com/server-webapp/html/getDatasheet?partID=743577&src-supplier=Verical, ComponentLink1URL=https://www.verical.com/server-webapp/html/getDatasheet?partID=743577&src-supplier=Verical, Construction=Rectangular, Contact Plating=Tin,Matte, Depth=0.5mm, Features="Automotive AEC-Q200", Height=0.016inch, Lead Free="Lead Free", Length=1mm, Manufacturer Part Number=RMCF0402FT4K70, Military Standard=Not, Mount="Surface Mount", Number of Terminations=2, Packaging="Tape and Reel", Pricing 1="1=0.1, 10=0.015, 100=0.0061, 1000=0.00274, 2500=0.00238, 5000=0.00197 (USD)", Radiation Hardening=No, RoHS Compliant=Yes, Series=RMCF, Stock 1=1222605, Supplier 1=Digi-Key, Width=0.02inch
R7: library part ERJP03J562V, "RES SMD 5.6 KOHM 5% 1/5W 0603", Case Code (Imperial)=0603, Case Code (Metric)=1608, Manufacturer=Panasonic, Manufacturer Part Number=ERJ-P03J562V, Max Operating Temperature=155°C, Min Operating Temperature=-55°C, Package Quantity=5000, Power Rating=200mW, Resistance=5.6kR, Resistor Type="Thick Film", Supplier Part Number 1=ERJ-P03J562V-ND, Temperature Coefficient=200ppm/°C, Tolerance=5%, Voltage Rating=150V, Case/Package=0603, Category="Chip SMD Resistors", ComponentLink1Description=http://www.mouser.com/ds/2/315/AOA0000CE4-64075.pdf?src-supplier=Mouser, ComponentLink1URL=http://www.mouser.com/ds/2/315/AOA0000CE4-64075.pdf?src-supplier=Mouser, ComponentLink2Description=http://www.onlinecomponents.com/datasheet/erj-p03j562v.aspx?p=44457454&src-supplier=Onlinecomponents.com, ComponentLink2URL=http://www.onlinecomponents.com/datasheet/erj-p03j562v.aspx?p=44457454&src-supplier=Onlinecomponents.com, Height=0.45mm, Length=1.6mm, Mount="Surface Mount", Packaging="Tape and Reel", Pricing 1="5000=0.02838 (USD)", RoHS=Yes, Supplier 1=Digi-Key, Termination=SMD/SMT, Width=0.8mm
R9: library part MCS0402MD1004BE000, "RES 1M OHM 0.1% 1/16W 0402", LCSC Part Number=C4334825, Manufacturer="Vishay BCcomponents", Supplier Part Number=594-MCS0402MD1004BE0, Category="Chip SMD Resistors", Item Type=Resistor, Manufacturer Part Number=MCS0402MD1004BE000, Pricing="1=0.56, 10=0.293, 50=0.293, 100=0.16, 1000=0.121, 10000=0.117 (USD)", RoHS=Yes, Stock=33788, Supplier=Mouser
R11: library part RC0402FR-071KL, "RES 1K OHM 1% 1/16W 0402", Case Code (Imperial)=0402, Case Code (Metric)=1005, LCSC Part Number=C106235, Manufacturer=Yageo, Max Operating Temperature=155°C, Max Power Dissipation=63mW, Min Operating Temperature=-55°C, Power Rating=62.5mW, Resistance=1kR, Resistance Tolerance=1%, Resistor Type="Thick Film", Temperature Coefficient=100ppm/°C, Voltage Rating=50V, Case/Package=0402, Category="Chip SMD Resistors", ComponentLink1Description=https://datasheet.ciiva.com/11819/0900766b80c66297-11819477.pdf?src-supplier=RSComponents, ComponentLink1URL=https://datasheet.ciiva.com/11819/0900766b80c66297-11819477.pdf?src-supplier=RSComponents, ComponentLink2Description=https://datasheet.ciiva.com/7983/1018594-7983502.pdf?src-supplier=Element14, ComponentLink2URL=https://datasheet.ciiva.com/7983/1018594-7983502.pdf?src-supplier=Element14, ComponentLink3Description=https://datasheet.ciiva.com/22747/1018594-22747513.pdf?src-supplier=Element14, ComponentLink3URL=https://datasheet.ciiva.com/22747/1018594-22747513.pdf?src-supplier=Element14, ComponentLink4Description=https://datasheet.ciiva.com/12666/pyu-rc0402-51-rohs-l-6-r-12666741.pdf?src-supplier=Mouser, ComponentLink4URL=https://datasheet.ciiva.com/12666/pyu-rc0402-51-rohs-l-6-r-12666741.pdf?src-supplier=Mouser, ComponentLink5Description=https://datasheet.ciiva.com/7849/1018594-7849869.pdf?src-supplier=Element14, ComponentLink5URL=https://datasheet.ciiva.com/7849/1018594-7849869.pdf?src-supplier=Element14, ComponentLink6Description=https://datasheet.ciiva.com/7849/1018594-7849871.pdf?src-supplier=Element14, ComponentLink6URL=https://datasheet.ciiva.com/7849/1018594-7849871.pdf?src-supplier=Element14, ComponentLink7Description=https://datasheet.ciiva.com/17063/pyu-rc0402-51-rohs-l-6-r-17063193.pdf?src-supplier=Future+Electronics, ComponentLink7URL=https://datasheet.ciiva.com/17063/pyu-rc0402-51-rohs-l-6-r-17063193.pdf?src-supplier=Future+Electronics, Construction=Rectangular, Depth=0.5mm, Features="Moisture Resistant", Height=0.32mm, Item Type=Resistor, Lead Free="Lead Free", Length=1mm, Manufacturer Part Number=RC0402FR-071KL, Military Standard=Not, Number of Pins=2, Number of Terminations=2, Packaging="Tape and Reel", Pricing 1="10000=0.00085, 20000=0.00087, 40000=0.00084, 60000=0.00083, 80000=0.00079, 100000=0.00078, 1000000=0.00076 (USD)", Reach SVHC Compliant=Yes, RoHS=Yes, RoHS Compliant=Yes, Series=RC, Size Code=0402, Stock 1=13030000, Supplier 1=Avnet, Supplier Part Number 1=RC0402FR-071KL, Technology="THICK FILM", Termination=SMD/SMT, Tolerance=1%, Voltage Rating (DC)=50V, Width=0.5mm
R13 R14: library part RC0402FR-075K1L, "RES 5.1K OHM 1% 1/16W 0402", Case Code (Imperial)=0402, Case Code (Metric)=1005, LCSC Part Number=C137973, Manufacturer=Yageo, Max Operating Temperature=155°C, Max Power Dissipation=63mW, Min Operating Temperature=-55°C, Package Quantity=1, Resistance=5.1kR, Resistance Tolerance=1%, Resistor Type="Thick Film", Temperature Coefficient=100ppm/°C, Voltage Rating=50V, Case/Package=0402, Category="Chip SMD Resistors", ComponentLink1Description=https://datasheet.ciiva.com/7983/1018594-7983519.pdf?src-supplier=Element14, ComponentLink1URL=https://datasheet.ciiva.com/7983/1018594-7983519.pdf?src-supplier=Element14, ComponentLink2Description=https://datasheet.ciiva.com/46394/1018594-46394936.pdf?src-supplier=Element14, ComponentLink2URL=https://datasheet.ciiva.com/46394/1018594-46394936.pdf?src-supplier=Element14, ComponentLink3Description=https://datasheet.ciiva.com/2453/pyu-r-int-thick-7-2453401.pdf?src-supplier=Digi-Key, ComponentLink3URL=https://datasheet.ciiva.com/2453/pyu-r-int-thick-7-2453401.pdf?src-supplier=Digi-Key, ComponentLink4Description=https://datasheet.ciiva.com/2453/pyu-r-int-thick-7-2453402.pdf?src-supplier=Digi-Key, ComponentLink4URL=https://datasheet.ciiva.com/2453/pyu-r-int-thick-7-2453402.pdf?src-supplier=Digi-Key, ComponentLink5Description=https://datasheet.ciiva.com/2453/pyu-r-int-thick-7-2453400.pdf?src-supplier=Digi-Key, ComponentLink5URL=https://datasheet.ciiva.com/2453/pyu-r-int-thick-7-2453400.pdf?src-supplier=Digi-Key, ComponentLink6Description=https://datasheet.ciiva.com/12558/pyu-rc0402-51-rohs-l-6-r-8721-12558460.pdf?src-supplier=Mouser, ComponentLink6URL=https://datasheet.ciiva.com/12558/pyu-rc0402-51-rohs-l-6-r-8721-12558460.pdf?src-supplier=Mouser, ComponentLink7Description=https://datasheet.ciiva.com/16744/pyu-rc0402-51-rohs-l-6-r-16744283.pdf?src-supplier=Future+Electronics, ComponentLink7URL=https://datasheet.ciiva.com/16744/pyu-rc0402-51-rohs-l-6-r-16744283.pdf?src-supplier=Future+Electronics, ComponentLink8Description=https://datasheet.ciiva.com/15189/getdatasheetpartid-323636-15189493.pdf?src-supplier=Verical, ComponentLink8URL=https://datasheet.ciiva.com/15189/getdatasheetpartid-323636-15189493.pdf?src-supplier=Verical, Construction=Rectangular, Depth=0.5mm, Features="Moisture Resistant", Height=0.016inch, Item Type=Resistor, Lead Free="Lead Free", Length=1mm, Manufacturer Part Number=RC0402FR-075K1L, Military Standard=Not, Number of Terminations=2, Packaging="Tape and Reel", Power Rating=63mW, Pricing 1="10000=0.00085 (USD)", RoHS=Yes, RoHS Compliant=Yes, Series=RC, Stock 1=65000, Supplier 1=Avnet, Supplier Part Number 1=RC0402FR-075K1L, Technology="THICK FILM", Termination=SMD/SMT, Tolerance=1%, Voltage Rating (DC)=50V, Width=0.02inch, Working Voltage=50V
SW1 SW2 SW3: "3mm 2mm Round Button 50mA Top3.65mm SPST 12V SMD Tactile Switches", LCSC Part Number=C318893, Manufacturer=XKB, ComponentLink1Description=LCSC, ComponentLink1URL=https://lcsc.com/product-detail/Tactile-Switches_XKB-Connectivity-TS-1185EC-C-D-B_C318893.html, Manufacturer Part Number=TS-1185EC-C-D-B
U1: "IC MCU 32BIT 128KB FLASH 48LQFP", Case/Package=LQFP, Clock Frequency=72MHz, LCSC Part Number=C8304, Manufacturer=STMicroelectronics, Max Operating Temperature=85°C, Max Power Dissipation=363mW, Max Supply Voltage=3.6V, Min Operating Temperature=-40°C, Min Supply Voltage=2V, Package Quantity=250, Supplier Part Number=511-STM32F103CBT6, Address Bus Width=32b, Category=Microcontrollers, ComponentLink1Description=https://datasheet.ciiva.com/23669/1714663-23669200.pdf?src-supplier=Newark, ComponentLink1URL=https://datasheet.ciiva.com/23669/1714663-23669200.pdf?src-supplier=Newark, ComponentLink2Description=https://datasheet.ciiva.com/15122/getdatasheetpartid-92132-15122195.pdf?src-supplier=Verical, ComponentLink2URL=https://datasheet.ciiva.com/15122/getdatasheetpartid-92132-15122195.pdf?src-supplier=Verical, ComponentLink3Description=https://datasheet.ciiva.com/5752/cd00161566-5752838.pdf?src-supplier=Farnell, ComponentLink3URL=https://datasheet.ciiva.com/5752/cd00161566-5752838.pdf?src-supplier=Farnell, ComponentLink4Description=https://datasheet.ciiva.com/14100/pustm-arm-microcont-stm32f103-en-14100509.pdf?src-supplier=Distrelec, ComponentLink4URL=https://datasheet.ciiva.com/14100/pustm-arm-microcont-stm32f103-en-14100509.pdf?src-supplier=Distrelec, ComponentLink5Description=https://datasheet.ciiva.com/1502/cd00161566-1502328.pdf?src-supplier=Digi-Key, ComponentLink5URL=https://datasheet.ciiva.com/1502/cd00161566-1502328.pdf?src-supplier=Digi-Key, ComponentLink6Description=https://datasheet.ciiva.com/4840/cd00161566-4840398.pdf?src-supplier=Mouser, ComponentLink6URL=https://datasheet.ciiva.com/4840/cd00161566-4840398.pdf?src-supplier=Mouser, ComponentLink7Description=https://datasheet.ciiva.com/16219/cd00161566-16219150.pdf?src-supplier=Future+Electronics, ComponentLink7URL=https://datasheet.ciiva.com/16219/cd00161566-16219150.pdf?src-supplier=Future+Electronics, Core Architecture=ARM, Data Bus Width=32b, Density=128KB, Frequency=72MHz, Height=1.45mm, Interface=I2C,SPI,USB,CAN,IrDA,UART,USART,LIN, Item Type=IC, Lead Free="Lead Free", Length=7mm, Manufacturer Part Number=STM32F103CBT6, Memory Format=FLASH, Memory Size=128KB, Number of ADC Channels=10, Number of Bits=32, Number of I2C Channels=2, Number of I/Os=37, Number of Programmable I/O=37, Number of PWM Channels=12, Number of SPI Channels=2, Number of Timers/Counters=4, Oscillator Type=Internal, Packaging=Tray, Peripherals="POR,PWM,WDT,DMA,Temp Sensor,I2C", Pins=48, Pricing="1=7.35, 10=6.65, 50=5.53, 100=5.49, 1000=4.31, 10000=4.25 (USD)", Radiation Hardening=No, RAM Size=20KB, Reach SVHC Compliant=No, RoHS=Yes, RoHS Compliant=Yes, Series="STM32 F1", Stock=3552, Supplier=Mouser, Termination=SMD/SMT, Watchdog Timer=Yes, Width=7.2mm
U2: "SENSOR MULT HUMIDITY/TEMP", Manufacturer="Texas Instruments", Supplier Part Number=595-HDC2022DEPR, Category="Integrated Circuits (ICs)", Item Type=Sensor, Manufacturer Part Number=HDC2022DEPR, Pricing="1=4.2, 10=2.66, 50=2.66, 100=2.58, 1000=2.02, 10000=1.94 (USD)", RoHS=Yes, Stock=5312, Supplier=Mouser
U3: "60uA 32x4 bit 2.4V~5.2V SSOP-48-300mil LCD Drivers ROHS", LCSC Part Number=C7873, Manufacturer="Holtek Semicon", Package=SSOP-48-300mil, ComponentLink1Description=LCSC, ComponentLink1URL=https://www.lcsc.com/product-detail/LCD-Drivers_Holtek-Semicon-HT1621B_C7873.html, Item Type=IC, Manufacturer Part Number=HT1621B
U4: "IC FLASH 32MBIT 133MHZ 8SOP", Case/Package=SOIC, Frequency=133MHz, LCSC Part Number=C82344, Manufacturer=Winbond, Max Operating Temperature=85°C, Min Operating Temperature=-40°C, Operating Supply Voltage=3V, Category=Flash, ComponentLink1Description=http://www.winbond.com/resource-files/w25q32jv%20revg%2003272018%20plus.pdf?src-supplier=Digi-Key, ComponentLink1URL=http://www.winbond.com/resource-files/w25q32jv%20revg%2003272018%20plus.pdf?src-supplier=Digi-Key, ComponentLink2Description=https://www.winbond.com/hq/product/code-storage-flash-memory/serial-nor-flash/?__locale=en&partNo=W25Q32JV&src-supplier=Avnet, ComponentLink2URL=https://www.winbond.com/hq/product/code-storage-flash-memory/serial-nor-flash/?__locale=en&partNo=W25Q32JV&src-supplier=Avnet, Density=32Mb, Interface=SPI,Serial, Item Type=IC, Manufacturer Part Number=W25Q32JVSSIQ, Memory Format=Non-Volatile,FLASH,NOR, Memory Size=32Mb, Mounting Technology="Surface Mount", Packaging=Rail/Tube, Page Size=256B, Pins=8, Pricing="1=0.6837, 25=0.5896, 100=0.5874, 500=0.5233, 5000=0.5007 (USD)", RoHS=Yes, RoHS Compliant=Yes, Series=SpiFlash®, Stock=8474, Supplier="Arrow Electronics", Supplier Part Number=W25Q32JVSSIQ
U5: "IC REG BOOST 3.3V 160MA SC70-6", Manufacturer="Texas Instruments", Supplier Part Number=595-TLV61225DCKR, Category="Voltage Regulators - Switching", ComponentLink1Description=https://datasheet.ciiva.com/15112/getdatasheetpartid-532583-15112453.pdf?src-supplier=Verical, ComponentLink1URL=https://datasheet.ciiva.com/15112/getdatasheetpartid-532583-15112453.pdf?src-supplier=Verical, ComponentLink2Description=https://datasheet.ciiva.com/14273/tlv61225-14273210.pdf?src-supplier=Avnet, ComponentLink2URL=https://datasheet.ciiva.com/14273/tlv61225-14273210.pdf?src-supplier=Avnet, ComponentLink3Description=https://datasheet.ciiva.com/2033/tlv61225-2033955.pdf?src-supplier=Digi-Key, ComponentLink3URL=https://datasheet.ciiva.com/2033/tlv61225-2033955.pdf?src-supplier=Digi-Key, ComponentLink4Description=https://datasheet.ciiva.com/29733/tlv61225-29733637.pdf?src-supplier=Digi-Key, ComponentLink4URL=https://datasheet.ciiva.com/29733/tlv61225-29733637.pdf?src-supplier=Digi-Key, ComponentLink5Description=https://datasheet.ciiva.com/29733/tlv61225-29733642.pdf?src-supplier=Digi-Key, ComponentLink5URL=https://datasheet.ciiva.com/29733/tlv61225-29733642.pdf?src-supplier=Digi-Key, ComponentLink6Description=https://datasheet.ciiva.com/29733/tlv61225-29733646.pdf?src-supplier=Digi-Key, ComponentLink6URL=https://datasheet.ciiva.com/29733/tlv61225-29733646.pdf?src-supplier=Digi-Key, Manufacturer Part Number=TLV61225DCKR, Pricing="1=1.15, 10=1.01, 50=1.01, 100=0.78, 1000=0.524, 10000=0.489 (USD)", RoHS=Yes, Stock=2348, Supplier=Mouser
X1: library part X803832768KGD4GI, "32.768kHz 12.5pF ±20ppm MC-306 Crystals ROHS", LCSC Part Number=C12675, Manufacturer=YXC, Package=MC-306, Item Type=Crystal, Manufacturer Part Number=X803832768KGD4GI
X2: library part X50328MSB2GI, "8MHz 20pF ±10ppm ±50ppm SMD5032-2P Crystals ROHS", LCSC Part Number=C115962, Manufacturer="Yangxing Tech", Package=SMD5032-2P, ComponentLink1Description=LCSC, ComponentLink1URL=https://www.lcsc.com/product-detail/Crystals_Yangxing-Tech-X50328MSB2GI_C115962.html, Item Type=Crystal, Manufacturer Part Number=X50328MSB2GI
X3: library part DXTF321532768C10F, "32.768kHz 7pF ±10ppm SMD3215-2P Crystals ROHS", LCSC Part Number=C5830643, Manufacturer=Shenzhen, Package=SMD3215-2P, ComponentLink1Description=LCSC, ComponentLink1URL=https://www.lcsc.com/product-detail/Crystals_Shenzhen-SCTF-Elec-DXTF321532768C10F_C5830643.html, Item Type=Crystal, Manufacturer Part Number=DXTF321532768C10F

## Free pads (board coordinates)
  round 78.74 hole 78.74 unplated: MH(2986.45,3600) MH(2988.45,1955.25) MH(4523.75,3598)

## Via types
v1: diameter 23.62, hole 11.81, Top Layer to Bottom Layer, tented both sides, 113 vias
v2: diameter 23.62, hole 11.81, Top Layer to Bottom Layer, 1 vias

## Nets (pads, with @x,y where several pads share a name; then routed paths per layer and width w, separated by ;. In a path a pad name is that pad's centre, name@x,y a point inside that pad or via, vN(x,y) a via of type N, cw(c..) or ccw(c..) an arc to the next point about the centre after c; other vN are vias at no path point)
3V3: C5.2 C6.2 C7.2 C8.2 C14.2 C15.2 C16.2 C17.2 C20.2 C21.2 C25.2 J1.1 J2.1 J4.1 P5.1 R2.2 R3.2 R5.1 R6.1 R10.2 R11.2 U1.9 U1.24 U1.36 U1.48 U2.5 U3.17 U4.8 U5.2 U5.4 | length 7377.7
  Top Layer w10: v1(3089,1937) 3161,1937 3189,1965 3192.97,1961.03 3192.97,1950.03 3199.25,1943.75 R3.2 ; C6.2@3492,2832 C6.2@3496,2836 ; C6.2 3500.91,2834.91 3500.91,2853.73 v1(3503.52,2856.34) ; v1@3822,3278 v1(3822,3281) ; C16.2@3864,2376 ccw(c3865.71,2376) 3865.71,2374.29 C17.2@3903,2374.29 ; v1@4072,2216 v1(4072,2222)
  Top Layer w12: U1.9 3442.52,2855.48 3466.5,2831.5 C6.2@3489,2831.5 ; C17.2 U3.17@3974.9,2375 ; U3.17 4042.71,2374.29 4057.35,2359.65
  Top Layer w16: v1(3665.95,3360.95) 3699.9,3327 U5.2
  Top Layer w20: 4057.35,2359.65 4072,2345 v1(4072,2222)
  Top Layer w22: 3061,2733 3061,2738.49 3020,2779.49 3020,2875 3076.5,2931.5 C8.2@3076.5,2942 ; 3200.21,1957.26 3202,1959.05 3202,2023 3220,2041 v1(4274,2041) v1(4431,2041) ; 3918.19,2991.19 4218.19,2991.19 4247,3020 v1(4305,3020) ; R10.2 4105.5,2013.5 4131.5,2039.5 ; v1(4198,2241) v1(4274,2241)
  Top Layer w25: 3334.5,3149.5 3334.5,3258.5 3436.95,3360.95 v1@3665.33,3360.95 ; v1(4431,2041) 4431,2449 J2.1
  Bottom Layer w20: v1(3031,2147) 3031,2211 3009,2233 2982,2233 2961,2212 ; v1(3081.38,2651.62) 3081.38,2594.38 2961,2474 2961,2212 ; v1(3089,1937) 3089,1997 3052,2034 2999,2034 2961,2072 2961,2212
  Bottom Layer w22: v1(4072,2222) 4091,2241 v1(4198,2241) ; v1@4274,2042 v1(4274,2241)
  Bottom Layer w25: v1(3503.52,2856.34) 3869,2856.34 3918,2905.34 v1(3918,3021) 3918,3240 3877,3281 v1@3822.44,3281 ; v1(3665.95,3360.95) 3745.9,3281 v1(3822,3281) ; v2(4388,3311) 4305,3228 v1(4305,3020) 4390,3020 J1.1 4428.31,2806.31 4428.31,2621.69 J2.1 ; v1(4431,2041) 4431,2006 4457,1980 J4.1
+5V: C22.2 J7.A4/B9 J7.B4/A9 R7.2 | length 736.8
  Top Layer w10: R7.2 R7.2@3584.21,3239
  Top Layer w12: C22.2 C22.2@3231,3474
  Top Layer w22: J7.A4/B9 3222.27,3435.27 ; C22.2@3231,3474 3231,3444 3222.27,3435.27 ; R7.2@3584.21,3239 3585.56,3239 3610.56,3214 v1(3611,3214) ; v1(3611,3435.27) 3222.27,3435.27
  Bottom Layer w22: v1(3611,3214) v1(3611,3435.27)
BOOT0: P2.1 R4.1 U1.44 | length 1482.1
  Top Layer w12: U1.44 3204.5,2812.33 3254.21,2860.42 3254.61,2860.75 3369.54,2954.13 3370.92,2954.76 3396.03,2966.26 v1(3431.81,2972.41) ; v1(3783,2907) 3827,2863 P2.1@4303,2863 ; P2.1 4377.27,2861 4433,2805.27 R4.1
  Bottom Layer w12: v1(3431.81,2972.41) 3717.59,2972.41 v1(3783,2907)
BOOT1: P1.1 R1.2 U1.20 | length 1464.9
  Top Layer w8: U1.20 3419.92,3111.7 3419.92,3138.6 3388,3170.52 3388,3187 3477.61,3276.61 3626.39,3276.61 3681.5,3221.5 3700,3203 4298,3203 4376,3125 R1.2
  Top Layer w12: P1.1 4359,2947 4376,2964 R1.2
BUTTON1: C1.2 R2.1 SW1.2 U1.10 | length 1665.6
  Top Layer w10: v1(3420.49,2361.49) 3481,2422 3615.96,2422 3683,2489.04 v1@3683,2721 ; v1(3431.81,2937) 3431.81,2893.61 U1.10
  Top Layer w12: R2.1 v1(3803.5,1987.5)
  Bottom Layer w10: v1(3420.49,2361.49) 3659,2122.98 3659,2048 3719.5,1987.5 v1(3803.5,1987.5) ; v1(3431.81,2937) 3431.81,2804.19 3505,2731 v1(3683,2731)
BUTTON2: C2.2 R3.1 SW2.2 U1.11 | length 1671.7